# Allegro board VESC_6_MK5_BRD_11_NOV_25_TEKPA.brd
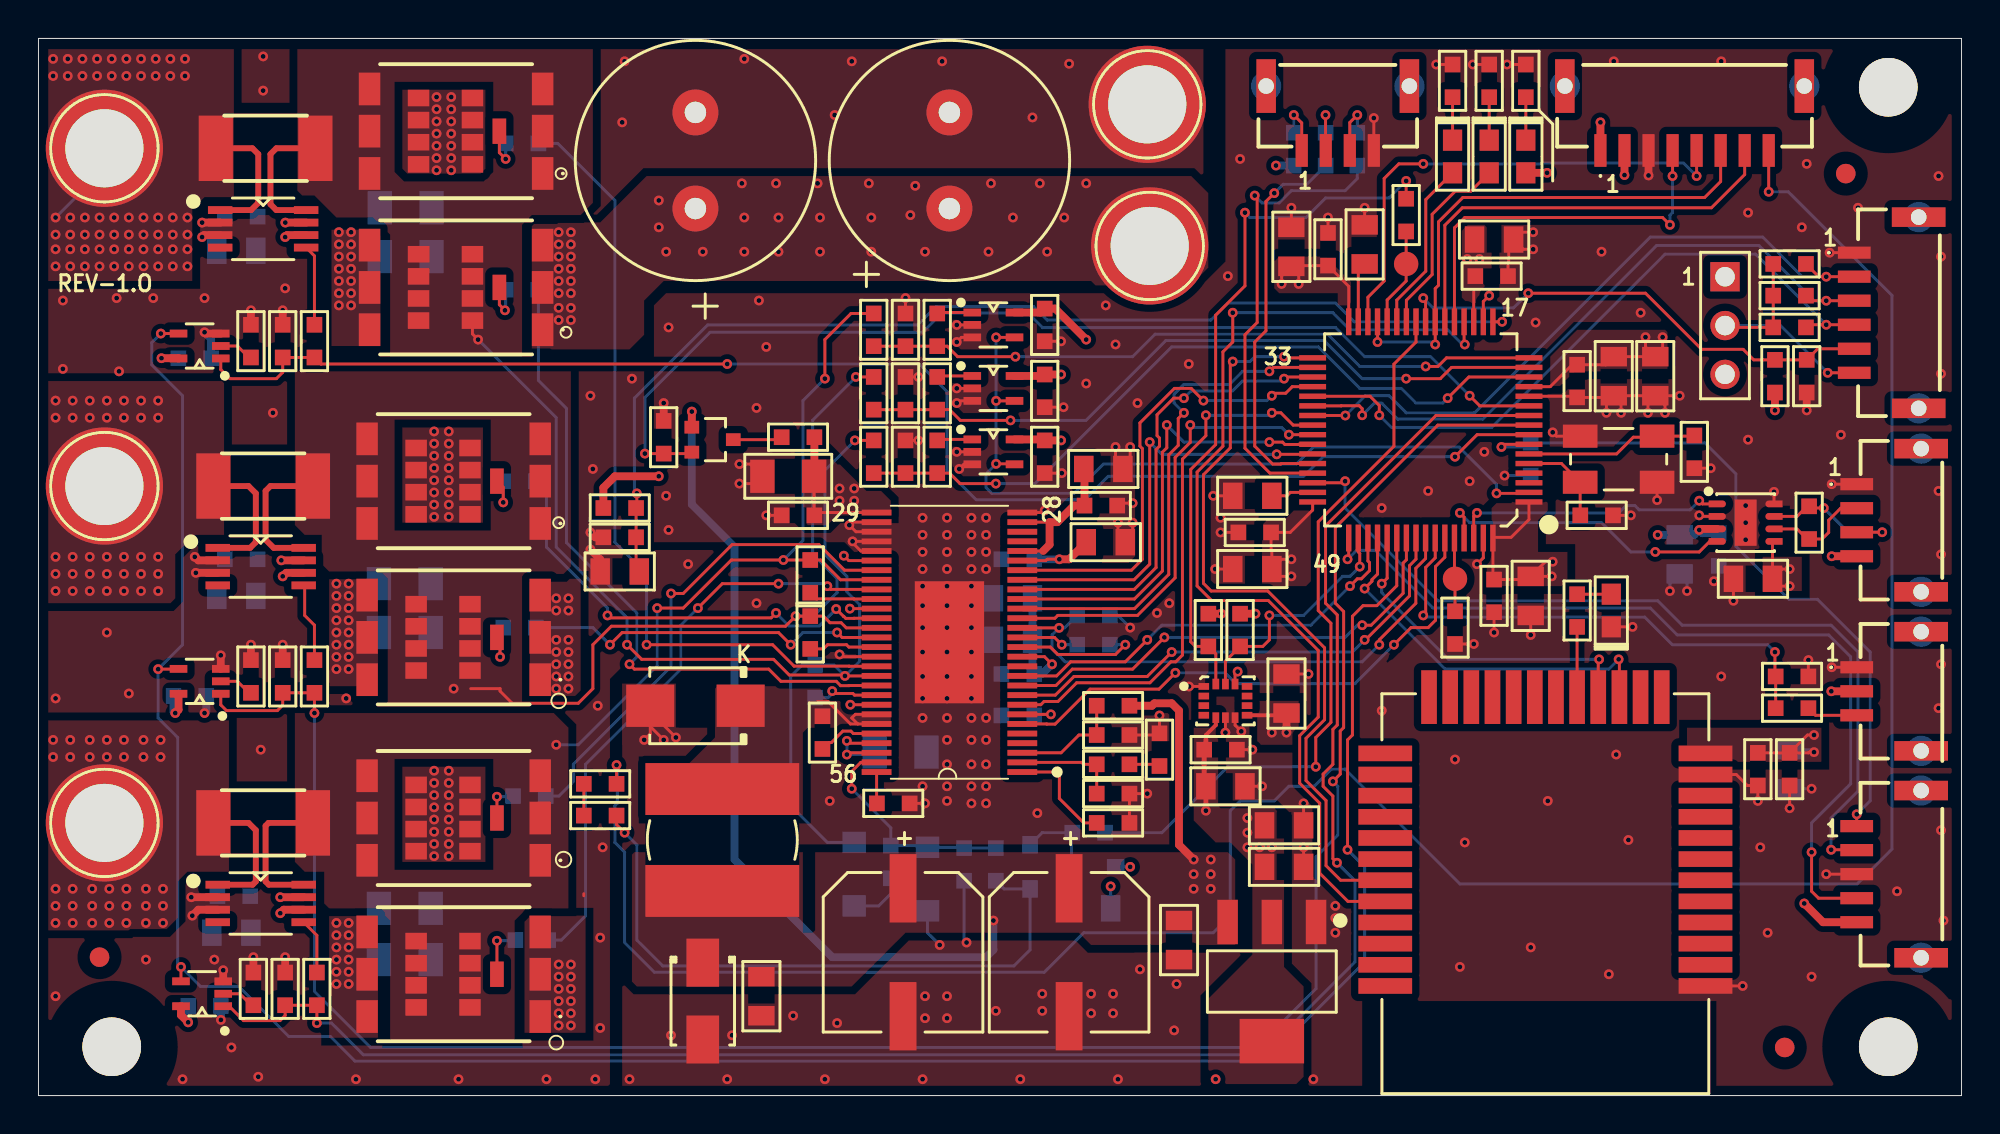
[diagram p0: board, top side]
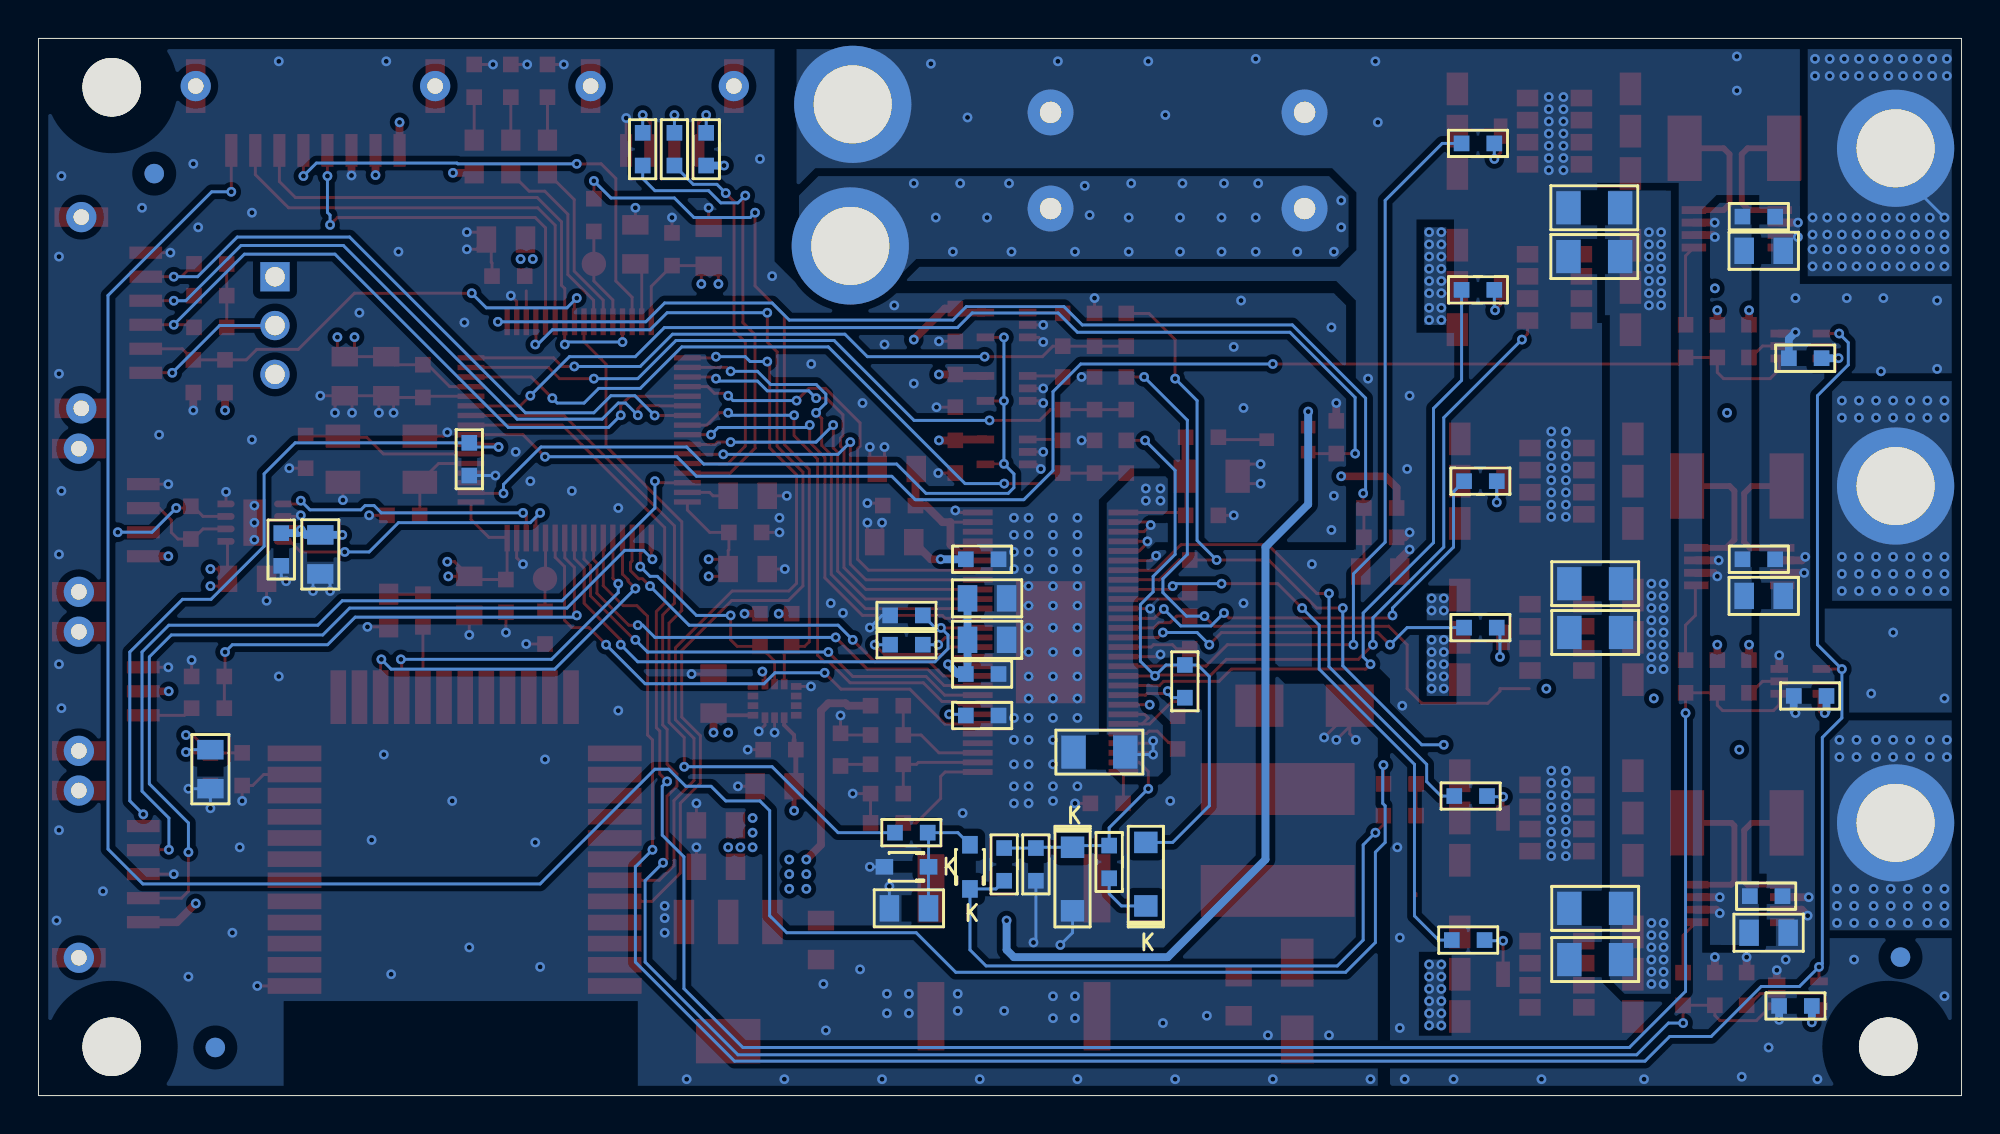
[diagram p1: board, bottom side, seen from below]

Outline 100 x 55 mm; copper layers: TOP, LYR_02_GND, LYR_03_PWR, BOTTOM. Coordinates in mm from the lower left corner of the outline.
Outline path: 0,55 0,0 100,0 100,55 0,55

## Design rules (mm)
constraint set DEFAULT: min track width 0.152

## Placement (name value [footprint] x y rotation side)
C1  2.2uF  [0805]  54.74 9.74 180 bottom
C2  100nF  [0603]  52.32 33.24 90 top
C3  100nF  [0603]  91.95 37.43 270 top
C4  100nF  [0603]  91.19 21.81 180 top
C5  2.2uF  [0805]  64.9 20.92 90 top
C6  2.2uF  [0805]  61.72 16.09 0 top
C7  2.2uF  [0805]  89.15 26.89 180 top
C8  2.2uF  [0805]  85.34 28.16 270 bottom
C9  2.2uF  [0805]  91.06 16.98 90 bottom
C10  100nF  [0603]  61.47 18 180 top
C11  100nF  [0603]  89.41 16.98 90 top
C12  1uf  [0603]  91.06 16.98 90 top
C13  4.7uF_100V  [1206]  44.83 17.87 180 bottom
C14  100nF  [0603]  40.77 18.89 270 top
C15  220nF  [0603]  40.39 21.55 90 bottom
C16  2.2uF  [0805]  37.59 5.17 270 top
C17  47uF  [CAP_8X10]  53.59 7.46 270 top
C18  47uF  [CAP_8X10]  44.96 7.46 270 top
C19  22nF  [0603]  54.86 23.46 0 bottom
C20  220nF  [0603]  40.13 24.09 90 top
C21  2.2uF  [0805]  50.67 25.87 0 bottom
C22  2.2uF  [0805]  50.67 23.71 0 bottom
C23  220nF  [0603]  40.13 27.01 90 top
C24  2.2uF  [0805]  55.5 28.79 180 top
C25  2.2uF  [0805]  55.37 32.6 180 top
C26  4.7uF_100V  [1206]  38.99 32.22 0 top
C27  100nF  [0603]  46.74 33.24 90 top
C28  100nF  [0603]  46.74 36.54 90 top
C29  100nF  [0603]  46.74 39.84 90 top
C30  2.2uF  [0805]  59.31 8.09 90 top
C31  2.2uF  [0805]  64.77 14.06 180 top
C32  2.2uF  [0805]  64.77 11.9 180 top
C33  4.7uF_100V  [1206]  19.1 46.19 0 bottom
C34  4.7uF_100V  [1206]  19.1 43.65 0 bottom
C35  100nF  [0603]  50.93 27.9 0 bottom
C36  4.7uF_100V  [1206]  19.05 24.09 0 bottom
C37  100nF  [0603]  39.5 30.19 0 top
C38  100nF  [0603]  50.93 21.93 0 bottom
C39  2.2uF  [0805]  10.29 43.95 0 bottom
C40  2.2uF  [0805]  10.29 26 0 bottom
C41  2.2uF  [0805]  10.03 8.47 0 bottom
C42  1n  [0603]  12.7 39.25 90 top
C43  1n  [0603]  12.7 21.81 90 top
C44  1n  [0603]  12.83 5.55 90 top
C45  15nF  [0603]  11.05 39.25 90 top
C46  15nF  [0603]  11.05 21.81 90 top
C47  15nF  [0603]  11.18 5.55 90 top
C48  2.2uF  [0805]  30.23 27.27 180 top
C49  680uF_63V  [ECAP_TH_12P5X35MM]  34.16 48.65 90 top
C50  680uF_63V  [ECAP_TH_12P5X35MM]  47.37 48.65 90 top
C51  15PF  [0603]  86.11 33.49 90 top
C52  100nF  [0603]  10.16 10.38 0 bottom
C53  100nF  [0603]  7.87 20.79 180 bottom
C54  100nF  [0603]  8.13 38.36 180 bottom
C55  100nF  [0603]  8.64 4.66 180 bottom
C56  2.2uF  [0805]  75.69 44.54 0 top
C57  2.2uF  [0805]  63.12 27.39 0 top
C58  2.2uF  [0805]  84.07 37.43 90 top
C59  2.2uF  [0805]  81.92 37.43 90 top
C60  2.2uF  [0805]  68.96 44.29 90 top
C61  2.2uF  [0805]  63.12 31.2 180 top
C62  100nF  [0603]  67.06 44.03 270 top
C63  100nF  [0603]  75.69 26 90 top
C64  100nF  [0603]  75.56 42.63 180 top
C65  100nF  [0603]  80.01 37.17 90 top
C66  6.8nF  [0603]  58.29 18 90 top
C67  100nF  [0603]  63.25 29.3 0 top
C68  120pF  [0603]  55.88 15.71 0 top
C69  15nF  [0603]  44.45 15.2 180 top
C70  100nF  [0603]  48.13 12.03 90 bottom
C71  100nF  [0603]  10.54 45.73 180 bottom
C72  100nF  [0603]  87.38 28.41 90 bottom
C73  100nF  [0603]  52.32 36.67 90 top
C74  4.7uF_100V  [1206]  19.05 26.63 0 bottom
C75  100nF  [0603]  55.24 30.7 180 top
C76  4.7uF_100V  [1206]  19.05 9.74 0 bottom
C77  4.7uF_100V  [1206]  19.05 7.07 0 bottom
C78  100nF  [0603]  77.6 33.11 90 bottom
C79  15PF  [0603]  81.03 30.19 180 top
C80  100nF  [0603]  10.54 27.9 0 bottom
C81  2.2uF  [0805]  65.15 44.16 270 top
C82  100nF  [0603]  52.32 40.09 90 top
C83  2.2uF  [0805]  77.6 26 90 top
D1  D_Schottky  [SOD_123]  42.42 11.52 270 bottom
D2  D_Schottky  [SOD_323]  51.56 11.9 90 bottom
D3  3.6V  [SOD_123]  46.23 11.27 90 bottom
D4  D_Schottky  [SOD_323]  54.86 11.9 0 bottom
D5  BLUE  [LED_0603]  77.34 48.86 90 top
D6  RED  [LED_0603]  73.53 48.86 90 top
D7  GREEN  [LED_0603]  75.44 48.86 90 top
D8  RED  [LED_0603]  81.79 25.24 270 top
D9  DIODE SCHOTTKY  [DO214AA]  34.16 20.28 180 top
D10  TVS_5V  [DO-214AC]  34.54 4.92 270 top
J4  CON3  [HDR_1X3]  87.7 42.6 270 top
L1  22uH  [IND_7P8X7P8_SDR0805]  35.56 13.3 90 top
NOREF  -  [unnamed]  96.19 2.54 0 top
NOREF#2  -  [unnamed]  3.81 2.54 0 top
NOREF#3  -  [unnamed#2]  3.17 7.2 0 top
NOREF#4  -  [#3]  0 55 0 top
NOREF#5  -  [unnamed#2]  93.98 47.97 0 top
NOREF#6  -  [#3]  0 0 90 top
NOREF#7  -  [unnamed#2]  90.81 2.5 0 top
NOREF#8  -  [#3]  -1429.39 -1577.61 0 top
NOREF#9  -  [unnamed]  96.19 52.46 0 top
NOREF#10  -  [unnamed#2]  93.98 47.97 180 bottom
NOREF#11  -  [unnamed#2]  90.81 2.5 180 bottom
NOREF#12  -  [unnamed#2]  3.17 7.2 180 bottom
P1  SWD_VER  [CON_4P_VRT_BM04BGHSTB]  67.56 51.4 180 top
P2  HALL_ENC  [CON_6P_VRT_BM06BGHSTBT]  96.65 40.73 90 top
P3  COMM  [CON_8P_VRT_BM08BGHSTBT]  85.6 51.4 180 top
P4  SERVO  [CON_3P_VRT_BM03BGHSTB]  96.77 20.41 90 top
P5  SWD_VER  [CON_5P_VRT_BM05BGHSTBT]  96.77 11.52 90 top
P6  CAN  [CON_4P_VRT_BM04BGHSTB]  96.77 29.93 90 top
P7  SUPPLY  [TP_TH_120MILS]  57.78 44.2 0 top
P8  PH_A  [TP_TH_120MILS]  3.43 49.28 0 top
P9  PH_B  [TP_TH_120MILS]  3.43 31.71 0 top
P10  PH_C  [TP_TH_120MILS]  3.43 14.19 0 top
P11  GND  [TP_TH_120MILS]  57.66 51.57 0 top
Q1  DMN62D0UW-7  [SOT323_3P]  35.05 34.13 270 top
Q2  IRF7749  [IRF7749L1TRPBF]  21.72 42.05 180 top
Q3  IRF7749  [IRF7749L1TRPBF]  21.59 6.31 180 top
Q4  IRF7749  [IRF7749L1TRPBF]  21.59 23.84 180 top
Q5  IRF7749  [IRF7749L1TRPBF]  21.72 50.17 180 top
Q6  IRF7749  [IRF7749L1TRPBF]  21.59 31.97 180 top
Q7  IRF7749  [IRF7749L1TRPBF]  21.59 14.44 180 top
R1  0R,DNP  [0603]  65.28 49.24 270 bottom
R2  22R  [0603]  66.93 49.24 270 bottom
R3  22R  [0603]  68.58 49.24 270 bottom
R4  2k2  [0603]  91.06 39.97 0 top
R5  39k  [0603]  44.32 12.15 90 bottom
R6  2k2  [0603]  91.06 41.62 0 top
R7  2k2  [0603]  91.06 43.27 0 top
R8  10k  [0603]  90.3 37.43 270 top
R9  56k  [0603]  49.78 12.03 90 bottom
R10  220R  [0603]  54.61 13.68 180 bottom
R11  1k_PTC  [0603]  29.21 14.57 0 top
R12  1k_PTC  [0603]  29.21 16.22 180 top
R13  100R  [0603]  91.19 20.16 0 top
R14  440R  [0603]  77.34 52.79 90 top
R15  220R  [0603]  73.53 52.79 90 top
R16  220R  [0603]  75.44 52.79 90 top
R17  1k  [0603]  60.83 24.22 90 top
R18  1k  [0603]  62.48 24.22 90 top
R19  220R  [0603]  92.08 29.81 90 top
R20  1k  [0603]  80.01 25.24 270 top
R21  3.3k  [0603]  55.88 18.76 180 top
R22  220K  [0603]  55.88 14.19 180 top
R23  15k  [0603]  55.88 17.23 180 top
R24  18k  [0603]  55.88 20.28 0 top
R25  10k  [0603]  50.93 19.77 0 bottom
R26  10k  [0603]  54.86 24.98 180 bottom
R27  39k  [0603]  39.5 34.25 180 top
R28  2k2  [0603]  32.51 34.25 90 top
R29  39k_60V  [0603]  43.43 33.24 270 top
R30  39k_60V  [0603]  43.43 36.54 270 top
R31  39k_60V  [0603]  43.43 39.84 270 top
R32  2k2  [0603]  45.09 33.24 90 top
R33  2k2  [0603]  45.09 36.54 90 top
R34  2k2  [0603]  45.09 39.84 90 top
R35  4.7R  [0603]  25.02 24.35 180 bottom
R36  4.7R  [0603]  25.15 41.92 180 bottom
R37  4.7R  [0603]  25.65 8.09 180 bottom
R38  0.0005R  [2512_MET]  11.81 49.28 0 top
R39  0.0005R  [2512_MET]  11.68 31.71 0 top
R40  0.0005R  [2512_MET]  11.68 14.19 0 top
R41  4.7R  [0603]  25.15 49.54 180 bottom
R42  4.7R  [0603]  25.02 31.97 180 bottom
R43  4.7R  [0603]  25.53 15.58 180 bottom
R44  1k  [0603]  14.35 39.25 90 top
R45  1k  [0603]  14.35 21.81 90 top
R46  1k  [0603]  14.48 5.55 90 top
R47  NTC_10K  [0603]  30.23 30.57 180 top
R48  10k  [0603]  30.23 29.05 0 top
R49  10k  [0603]  73.66 24.35 90 top
R50  0R  [0603]  71.12 45.81 270 top
TP1  T POINT R  [TP_50MIL]  71.12 43.27 180 top
TP2  T POINT R  [TP_50MIL]  73.66 26.89 180 top
U1  DRV8301  [HTSSOP_56P_6X14MM]  47.37 23.58 180 top
U2  BMI270  [LGA_14P_2P5X3MM]  61.72 20.54 0 top
U3  TJA1051TK3  [VSON_8P_3X3MM_TP]  88.77 29.81 270 top
U4  Core51822(B)  [BLE_36P_MOD_17X20P8MM_NRF_CORE51822B]  78.36 10.5 180 top
U5  TC2117  [SOT223_4P]  64.14 5.93 270 top
U6  MC74VHC1GT66  [SC70_5P]  49.66 33.49 0 top
U7  MC74VHC1GT66  [SC70_5P]  49.66 36.79 0 top
U8  MC74VHC1GT66  [SC70_5P]  49.66 40.09 0 top
U9  AD8418  [MSOP8]  11.68 45.09 0 top
U10  AD8418  [MSOP8]  11.56 27.52 0 top
U11  AD8418  [MSOP8]  11.56 10 0 top
U12  MC74VHC1GT66  [SC70_5P]  8.38 39 180 top
U13  MC74VHC1GT66  [SC70_5P]  8.38 21.55 180 top
U14  MC74VHC1GT66  [SC70_5P]  8.51 5.3 180 top
U15  STM32F405RGT6_LQFP64  [LQFP64_10X10MM]  71.88 34.63 180 top
Y1  ABM3B-8.000MHZ  [XTAL_4P_5X3P2MM_ABM3B]  82.17 33.11 0 top

## Library data of the parts
C1-C16 C19-C48 C51-C83 = CAP NP
C17 C18 C49 C50 = CAP POL_0
D1 D2 D4 = DIODE SCHOTTKY_0
D3 = DIODE31_0
D5-D8 = LED_3
D9 = DIODE SCHOTTKY_1
D10 = DIODE TVS_0
J4 = CON3_1
L1 = INDUCTOR
P1 = CON6A_8
P2 = CON6_0
P3 = CON8
P4 = CON3
P5 = CON5
P6 = CON4_0
P7-P11 = CON1
Q1 = MOSFET N_3
Q2-Q7 = MOSFET N_5
R1-R37 R41-R50 = R
R38-R40 = R_3
TP1 TP2 = T POINT R
U1 = CON58_3
U2 = CON14C_1
U3 = CON8_8
U4 = CON28C_9
U5 = CON2AP_4
U6-U8 U12-U14 = CON6A_5
U9-U11 = CON8A_5
U15 = CON60_5
Y1 = CRYSTAL1-4/SM_9

## Footprints (pads in the part's own frame, mm; a bottom-side part is the same pattern mirrored in y, then rotated)
0603
  rect 0.813x0.813 smd: 1(-0.851,0) 2(0.851,0)
0805
  rect 1.016x1.372 smd: 1(-1.016,0) 2(1.016,0)
1206
  rect 1.27x1.727 smd: 1(-1.346,0) 2(1.346,0)
2512_MET
  rect 1.778x3.404 smd: 1(-2.589,0) 2(2.589,0)
BLE_36P_MOD_17X20P8MM_NRF_CORE51822B
  rect 2.794x0.813 smd: 1(-8.327,4.8) 2(-8.327,3.7) 3(-8.327,2.6) 4(-8.327,1.5) 5(-8.327,0.4) 6(-8.327,-0.7) 7(-8.327,-1.8) 8(-8.327,-2.9) 9(-8.327,-4) 10(-8.327,-5.1) 11(-8.327,-6.2) 12(-8.327,-7.3) 25(8.327,-7.3) 26(8.327,-6.2) 27(8.327,-5.1) 28(8.327,-4) 29(8.327,-2.9) 30(8.327,-1.8) 31(8.327,-0.7) 32(8.327,0.4) 33(8.327,1.5) 34(8.327,2.6) 35(8.327,3.7) 36(8.327,4.8)
  rect 0.813x2.794 smd: 13(-6.05,-10.227) 14(-4.95,-10.227) 15(-3.85,-10.227) 16(-2.75,-10.227) 17(-1.65,-10.227) 18(-0.55,-10.227) 19(0.55,-10.227) 20(1.65,-10.227) 21(2.75,-10.227) 22(3.85,-10.227) 23(4.95,-10.227) 24(6.05,-10.227)
CAP_8X10
  rect 3.556x1.397 smd: N(3.328,0) P(-3.328,0)
CON_3P_VRT_BM03BGHSTB
  rect 1.016x2.794 hole 0.813: (-2.475,-1.125) (3.725,-1.125)
  rect 0.635x1.702 smd: 1(1.875,2.225) 2(0.625,2.225) 3(-0.625,2.225)
CON_4P_VRT_BM04BGHSTB
  rect 1.016x2.794 hole 0.813: (-3.725,-1.125) (3.725,-1.125)
  rect 0.635x1.702 smd: 1(1.875,2.225) 2(0.625,2.225) 3(-0.625,2.225) 4(-1.875,2.225)
CON_5P_VRT_BM05BGHSTBT
  rect 1.016x2.794 hole 0.813: (-4.35,-1.125) (4.35,-1.125)
  rect 0.635x1.702 smd: 1(2.5,2.225) 2(1.25,2.225) 3(0,2.225) 4(-1.25,2.225) 5(-2.5,2.225)
CON_6P_VRT_BM06BGHSTBT
  rect 1.016x2.794 hole 0.813: (-4.975,-1.125) (4.975,-1.125)
  rect 0.635x1.702 smd: 1(3.125,2.225) 2(1.875,2.225) 3(0.625,2.225) 4(-0.625,2.225) 5(-1.875,2.225) 6(-3.125,2.225)
CON_8P_VRT_BM08BGHSTBT
  rect 1.016x2.794 hole 0.813: (-6.225,-1.125) (6.225,-1.125)
  rect 0.635x1.702 smd: 1(4.375,2.225) 2(3.125,2.225) 3(1.875,2.225) 4(0.625,2.225) 5(-0.625,2.225) 6(-1.875,2.225) 7(-3.125,2.225) 8(-4.375,2.225)
DO214AA
  rect 2.5x2.2 smd: A(2.35,0) K(-2.35,0)
DO-214AC
  rect 2.5x1.7 smd: A(2,0) K(-2,0)
ECAP_TH_12P5X35MM
  round 2.388 hole 1.118: N(2.5,0) P(-2.5,0)
HDR_1X3
  rect 1.524x1.524 hole 1.016: 1(0,0)
  round 1.524 hole 1.016: 2(2.54,0) 3(5.08,0)
HTSSOP_56P_6X14MM
  rect 1.549x0.305 smd: 1(-3.788,6.75) 2(-3.788,6.25) 3(-3.788,5.75) 4(-3.788,5.25) 5(-3.788,4.75) 6(-3.788,4.25) 7(-3.788,3.75) 8(-3.788,3.25) 9(-3.788,2.75) 10(-3.788,2.25) 11(-3.788,1.75) 12(-3.788,1.25) 13(-3.788,0.75) 14(-3.788,0.25) 15(-3.788,-0.25) 16(-3.788,-0.75) 17(-3.788,-1.25) 18(-3.788,-1.75) 19(-3.788,-2.25) 20(-3.788,-2.75) 21(-3.788,-3.25) 22(-3.788,-3.75) 23(-3.788,-4.25) 24(-3.788,-4.75) 25(-3.788,-5.25) 26(-3.788,-5.75) 27(-3.788,-6.25) 28(-3.788,-6.75) 29(3.788,-6.75) 30(3.788,-6.25) 31(3.788,-5.75) 32(3.788,-5.25) 33(3.788,-4.75) 34(3.788,-4.25) 35(3.788,-3.75) 36(3.788,-3.25) 37(3.788,-2.75) 38(3.788,-2.25) 39(3.788,-1.75) 40(3.788,-1.25) 41(3.788,-0.75) 42(3.788,-0.25) 43(3.788,0.25) 44(3.788,0.75) 45(3.788,1.25) 46(3.788,1.75) 47(3.788,2.25) 48(3.788,2.75) 49(3.788,3.25) 50(3.788,3.75) 51(3.788,4.25) 52(3.788,4.75) 53(3.788,5.25) 54(3.788,5.75) 55(3.788,6.25) 56(3.788,6.75)
  rect 3.607x6.35 smd: 57(0,0)
IND_7P8X7P8_SDR0805
  rect 2.7x8 smd: 1(-2.65,0) 2(2.65,0)
IRF7749L1TRPBF
  rect 1.118x1.702 smd: 1(-4.5,2.2) 2(-4.5,0) 3(-4.5,-2.2) 4(4.5,-2.2) 5(4.5,0) 6(4.5,2.2)
  rect 0.711x1.321 smd: 7(-2.25,0)
  rect 1.118x0.864 smd: 8(-0.85,1.725) 9(-0.85,0.575) 10(-0.85,-0.575) 11(-0.85,-1.725) 12(1.95,-1.725) 13(1.95,-0.575) 14(1.95,0.575) 15(1.95,1.725)
LED_0603
  rect 1.1x1 smd: A(-0.85,0) K(0.85,0)
LGA_14P_2P5X3MM
  rect 0.55x0.35 smd: 1(-1.125,0.75) 2(-1.125,0.25) 3(-1.125,-0.25) 4(-1.125,-0.75) 8(1.125,-0.75) 9(1.125,-0.25) 10(1.125,0.25) 11(1.125,0.75)
  rect 0.35x0.55 smd: 5(-0.5,-0.875) 6(0,-0.875) 7(0.5,-0.875) 12(0.5,0.875) 13(0,0.875) 14(-0.5,0.875)
LQFP64_10X10MM
  rect 1.397x0.279 smd: 1(-5.625,3.749) 2(-5.625,3.251) 3(-5.625,2.751) 4(-5.625,2.25) 5(-5.625,1.75) 6(-5.625,1.25) 7(-5.625,0.749) 8(-5.625,0.249) 9(-5.625,-0.249) 10(-5.625,-0.749) 11(-5.625,-1.25) 12(-5.625,-1.75) 13(-5.625,-2.25) 14(-5.625,-2.751) 15(-5.625,-3.251) 16(-5.625,-3.749) 33(5.625,-3.749) 34(5.625,-3.251) 35(5.625,-2.751) 36(5.625,-2.25) 37(5.625,-1.75) 38(5.625,-1.25) 39(5.625,-0.749) 40(5.625,-0.249) 41(5.625,0.249) 42(5.625,0.749) 43(5.625,1.25) 44(5.625,1.75) 45(5.625,2.25) 46(5.625,2.751) 47(5.625,3.251) 48(5.625,3.749)
  rect 0.279x1.397 smd: 17(-3.749,-5.625) 18(-3.251,-5.625) 19(-2.751,-5.625) 20(-2.25,-5.625) 21(-1.75,-5.625) 22(-1.25,-5.625) 23(-0.749,-5.625) 24(-0.249,-5.625) 25(0.249,-5.625) 26(0.749,-5.625) 27(1.25,-5.625) 28(1.75,-5.625) 29(2.25,-5.625) 30(2.751,-5.625) 31(3.251,-5.625) 32(3.749,-5.625) 49(3.749,5.625) 50(3.251,5.625) 51(2.751,5.625) 52(2.25,5.625) 53(1.75,5.625) 54(1.25,5.625) 55(0.749,5.625) 56(0.249,5.625) 57(-0.249,5.625) 58(-0.749,5.625) 59(-1.25,5.625) 60(-1.75,5.625) 61(-2.25,5.625) 62(-2.751,5.625) 63(-3.251,5.625) 64(-3.749,5.625)
MSOP8
  rect 1.27x0.406 smd: 1(-2.235,0.975) 2(-2.235,0.325) 3(-2.235,-0.325) 4(-2.235,-0.975) 5(2.235,-0.975) 6(2.235,-0.325) 7(2.235,0.325) 8(2.235,0.975)
SC70_5P
  rect 0.914x0.406 smd: 1(-1.098,0.648) 2(-1.098,0) 3(-1.098,-0.648) 4(1.098,-0.648) 5(1.098,0.648)
SOD_123
  rect 1.118x1.219 smd: A(-1.652,0) K(1.652,0)
SOD_323
  rect 0.914x0.813 smd: A(1.15,0) K(-1.15,0)
SOT223_4P
  rect 2.311x1.067 smd: 1(-3.1,2.3) 2(-3.1,0) 3(-3.1,-2.3)
  rect 2.311x3.353 smd: 4(3.1,0)
SOT323_3P
  rect 0.66x0.762 smd: 1(-0.65,-1.078) 2(0.65,-1.078) 3(0,1.078)
TP_50MIL
  round 1.27 smd: 1(0,0)
TP_TH_120MILS
  round 6.096 hole 4.064: 1(0,0)
unnamed
  round 3.048 hole 3.175 unplated: (0,0)
unnamed#2
  round 1.016 smd: 1(0,0)
VSON_8P_3X3MM_TP
  custom 0.35x0.892 smd: 1(-0.975,-1.475) 2(-0.325,-1.475) 3(0.325,-1.475) 4(0.975,-1.475) 5(0.975,1.475) 6(0.325,1.475) 7(-0.325,1.475) 8(-0.975,1.475)
  rect 2.413x1.143 smd: 9(0,0)
XTAL_4P_5X3P2MM_ABM3B
  rect 1.8x1.2 smd: 1(-2,-1.2) 2(2,-1.2) 3(2,1.2) 4(-2,1.2)

## Nets
+5V: C8.1 C16.1 C17.P C18.P C30.2 C72.2 D10.K(CATHODE) J4.1 L1.1 P3.1 P4.2 P6.4 Q1.1 R1.2 R24.2 U3.3 U5.3(VI)
VCC: C2.2 C5.1 C6.1 C7.1 C9.2 C10.2 C11.2 C12.2 C31.2 C32.2 C39.2 C40.2 C41.2 C52.2 C53.2 C54.2 C55.2 C56.1 C57.2 C58.2 C59.2 C62.2 C63.2 C64.2 C65.2 C67.2 C71.1 C73.2 C80.2 C81.2 C82.2 C83.2 D5.A J4.3 P3.2 P5.5 R8.2 R17.2 R18.2 R47.2 U1.49 U2.5(VDDIO) U2.8 U2.12 U3.5(VIO) U4.12(VCC) U5.2 U5.4 U6.5(VCC) U7.5(VCC) U8.5(VCC) U9.6(VS) U9.7 U10.6(VS) U10.7 U11.6(VS) U11.7 U12.5(VCC) U13.5(VCC) U14.5(VCC) U15.1 U15.13 U15.19 U15.32 U15.48 U15.64
0: C1.1 C2.1 C3.2 C4.1 C5.2 C6.2 C7.2 C8.2 C9.1 C10.1 C11.1 C12.1 C13.1 C16.2 C17.N C18.N C21.1 C22.1 C24.1 C25.1 C26.1 C30.1 C31.1 C32.1 C35.1 C37.1 C38.1 C51.1 C56.2 C57.1 C58.1 C59.1 C60.2 C61.2 C62.1 C63.1 C64.1 C65.1 C66.2 C67.1 C68.2 C69.1 C70.1 C72.1 C73.1 C75.1 C78.1 C79.1 C81.1 C82.1 C83.1 D3.A D4.A D8.K(CATHODE) D9.A D10.A P1.4 P2.1 P3.3 P4.1 P5.3 P6.1 R14.2 R15.2 R16.2 R21.1 R22.1 R25.1 R26.1 R28.2 R32.2 R33.2 R34.2 R49.1 U1.28 U1.30 U1.31 U1.32 U1.33 U1.57 U2.1 U2.6 U2.7 U3.2 U3.8 U3.9 U4.1 U4.11 U5.1 U6.2 U6.3 U7.2 U7.3 U8.2 U8.3 U15.12 U15.18 U15.63(VSS_2) Y1.2 Y1.4
BT_HV: C13.2 C26.2 C33.1 C34.1 C36.1 C37.2 C49.P C50.P C74.1 C76.1 C77.1 P7.1 Q2.1 Q2.2 Q2.3 Q2.4 Q2.5 Q2.6 Q3.1 Q3.2 Q3.3 Q3.4 Q3.5 Q3.6 Q4.1 Q4.2 Q4.3 Q4.4 Q4.5 Q4.6 R27.1 U1.29 U1.53 U1.54
C_A: R44.2 U9.5
C_B: R45.2 U10.5
C_C: R46.2 U11.5
CONN_SW: P3.8 R12.1
EN_BUCK: C70.2 D3.K R5.2 R9.2 U1.55
PH_A: P8.1 R38.1 U9.1
PH_B: P9.1 R39.1 U10.1
PH_C: P10.1 R40.1 U11.1
SH_A: C15.2 D1.A Q2.8 Q2.9 Q2.10 Q2.11 Q2.12 Q2.13 Q2.14 Q2.15(S8) Q5.1 Q5.2 Q5.3 Q5.4 Q5.5 Q5.6 R29.1 R38.2 U1.46 U9.8
SHUTDOWN: R10.1 U15.25
N113958: J4.2 P2.6 R4.1 R6.1 R7.1
N114102: P2.2 R7.2 U15.39
N114106: P2.3 R6.2 U15.38
N114110: P2.4 R4.2 U15.37
N114114: C3.1 P2.5 R8.1 U15.24
N119424: P4.3 R13.2
N119428: C4.2 R13.1 U15.58
N316048: P5.4 U15.49
N316068: P5.2 U15.46
N316080: C78.2 P5.1 U15.7
N316972: D5.K(CATHODE) R14.1
N317032: D6.A U15.27
N317036: D6.K(CATHODE) R15.1
N317096: D7.A U15.26
N317100: D7.K(CATHODE) R16.1
N320425: D2.K(CATHODE) R9.1 R11.2
N320494: R11.1 R12.2
N320696: C1.2 D2.A D4.K(CATHODE) R10.2
N321457: D1.K(CATHODE) R5.1
N379550: C60.1 U15.31
N379578: C61.1 U15.47
N382210: C69.2 U1.56
N382270: C66.1 R23.1
N382306: R21.2 R24.1 U1.3(VSENSE)
N382374: C68.1 R23.2 U1.2
N382386: R22.2 U1.1
N382652: C14.2 U1.52
N382656: C14.1 D9.K(CATHODE) L1.2 U1.50 U1.51
N382740: R25.2 U1.7
N382848: C15.1 U1.48
N382956: C21.2 C22.2 C38.2 U1.13
N383040: C19.2 U1.14
N383044: C20.1 U1.43
N383064: C19.1 U1.15
N383228: C23.1 U1.38
N383264: Q1.3 R27.2
N383316: C24.2 C35.2 U1.23
N383358: C25.2 C75.2 U1.24 U1.27
N399081: Q5.7 R41.2
N399151: Q2.7 R36.2
N405714: Q4.7 R35.2
N405958: Q6.7 R42.2
N406713: Q3.7 R37.2
N406957: Q7.7 R43.2
N413411: C45.1 U12.2
N415177: C46.1 U13.2
N415727: C47.1 U14.2
N421403: P1.1(VBUS) R1.1
N421435: P1.2 R2.1
N421455: R2.2 U15.44
N421467: P1.3 R3.1
N421471: R3.2 U15.45
N440238: C79.2 U15.5 Y1.1
N440256: C51.2 U15.6 Y1.3
N453854: C27.2 U6.1
N453874: C28.2 U7.1
N453894: C29.2 U8.1
N475951: R49.2 TP2.1(TP) U15.60
N476249: R50.2 TP1.1(TP) U15.28
N483635: R36.1 U1.47
N483651: R41.1 U1.45
N483659: C33.2 C34.2 C36.2 C39.1 C40.1 C41.1 C42.2 C43.2 C44.2 C45.2 C46.2 C47.2 C48.2 C49.N C50.N C52.1 C53.1 C54.1 C55.1 C71.2 C74.2 C76.2 C77.2 C80.1 P11.1 Q5.8 Q5.9 Q5.10 Q5.11 Q5.12 Q5.13 Q5.14 Q5.15(S8) Q6.8 Q6.9 Q6.10 Q6.11 Q6.12 Q6.13 Q6.14 Q6.15(S8) Q7.8 Q7.9 Q7.10 Q7.11 Q7.12 Q7.13 Q7.14 Q7.15(S8) R48.1 U1.34 U1.39 U1.44 U9.2 U9.3 U10.2 U10.3 U11.2 U11.3 U12.3 U13.3 U14.3
N488558: P6.3 R19.2 U3.7
N488562: P6.2 R19.1 U3.6
N488738: R18.1 U2.13 U15.50
N488742: R17.1 R50.1 U2.14
N490262: U3.1 U15.62
N490274: U3.4 U15.61
N490496: U4.32 U15.20
N490506: U4.31 U15.33
N490510: U4.15 U15.52
N490514: U4.16 U15.53
N490522: R20.2 U4.17
N492162: P3.7 U15.22
N492166: P3.6 U15.23 U15.29
N492170: P3.5 U15.30
N492258: P3.4 U15.21
N494356: U1.17 U15.41
N494360: U1.19 U15.42
N494364: U1.21 U15.43
N494368: U1.18 U15.34
N494372: U1.20 U15.35
N494376: U1.22 U15.36
N494756: U1.6 U15.59
N494760: R26.2 U1.16 U15.57
N495156: U1.10 U15.55
N495160: U1.9 U15.56
N495164: U1.11 U15.51
N495168: U1.8 U15.40
N495709: C27.1 R29.2 R32.1 U15.14
N495713: C28.1 R30.2 R33.1 U15.15
N495717: C29.1 R31.2 R34.1 U15.16
N495721: Q1.2(S) R28.1 U15.11
N495725: U6.4 U7.4 U8.4 U15.2
N495729: U12.4 U13.4 U14.4 U15.54
N495741: C42.1 R44.1 U12.1 U15.8
N495753: C43.1 R45.1 U13.1 U15.9
N495765: C44.1 R46.1 U14.1 U15.10
N495777: C48.1 R47.1 R48.2 U15.17
N496269: R35.1 U1.42
N496273: C20.2 Q4.8 Q4.9 Q4.10 Q4.11 Q4.12 Q4.13 Q4.14 Q4.15(S8) Q6.1 Q6.2 Q6.3 Q6.4 Q6.5 Q6.6 R30.1 R39.2 U1.41 U10.8
N496277: R42.1 U1.40
N496285: R37.1 U1.37
N496289: C23.2 Q3.8 Q3.9 Q3.10 Q3.11 Q3.12 Q3.13 Q3.14 Q3.15(S8) Q7.1 Q7.2 Q7.3 Q7.4 Q7.5 Q7.6 R31.1 R40.2 U1.36 U11.8
N496293: R43.1 U1.35
N4906060: D8.A R20.1

Pads without a net: NOREF#3 1; NOREF#5 1; NOREF#7 1; NOREF#10 1; NOREF#11 1; NOREF#12 1; U1 4 5 12 25 26; U2 2 3 4 9 10 11; U4 2 3 4 5 6 7 8 9 10 13 14 18 19 20 21 22 23 24 25 26 27 28 29 30 33 34 35 36; U9 4; U10 4; U11 4; U15 3 4

## Via types
v1: diameter 0.508, hole 0.254, TOP to BOTTOM, 774 vias

## Routing (per net, layer and track width the routed paths; a pad name or vN(x,y) marks a point on that pad's centre or on a via; arc(x,y) is an arc through that point)
+5V: length 62.5
  TOP w0.406: v1(60.07,12.28) 59.31,13.04 59.31,20.03 58.93,20.41 58.03,20.41 57.9,20.28 R24.2 ; U3.3 86.42,29.48 v1(86.36,29.43) ; Q1.1 v1(33.97,35.59) ; P3.1 v1(81.22,50.64) ; P4.2 v1(93.23,21.03) ; P6.4 v1(93.25,28.06)
  BOTTOM w0.406: R1.2 v1(64.35,48.39) ; v1(49.66,9.11) 49.66,7.58 49.28,7.2 41.27,7.2 36.2,12.28 36.2,28.54 33.97,30.76 v1(33.97,35.59) ; C72.2 86.53,29.26 v1(86.36,29.43) 86.11,29.17 C8.1 v1(84.2,29.17)
  vias: v1(60.07,11.52) v1(60.07,10.76) v1(60.96,12.28) v1(60.96,11.52) v1(60.96,10.76)
VCC: length 90.5
  TOP w0.152: U15.48 66.26,30.46 65.09,29.3 C67.2 64.1,28.4 64.14,28.36 C57.2 ; v1(65.53,42.23) 65.53,42.76 65.15,43.14 ; 65.15,43.14 64.64,42.63 v1(64.64,42.23) ; 65.15,43.14 65.19,43.18 C62.2 68.13,42.1 U15.32 ; U15.1 77.51,29.97 76.58,29.05 75.67,29.05 U15.64 75.63,26.91 C63.2 77.43,26.85 C83.2 ; v1(91.06,27.39) 90.68,27.39 C7.1 ; U1.49 v1(42.22,20.33) ; v1(83.57,39.46) 83.57,38.95 C58.2 ; U15.19 74.63,41.87 ; C57.2 64.52,27.01 v1(65.15,27.01) ; C57.2 64.64,27.9 v1(65.15,27.9) ; C83.2 v1(78.69,27.01) ; C83.2 78.36,27.78 v1(78.74,27.78) ; C7.1 90.55,26.51 v1(91.06,26.51) ; C7.1 90.17,28.75 U3.5 ; v1(92.33,18.76) 91.99,18.76 C12.2 ; C12.2 92.04,17.83 92.08,17.87 v1(92.33,17.87) ; C12.2 C11.2 ; v1(84.45,39.46) 84.45,38.82 C58.2 ; C58.2 C59.2 81.5,38.02 C65.2 79.75,38.02 78.61,36.88 U15.13 ; v1(62.36,22.06) 62.22,21.93 U2.12
  TOP w0.203: U2.8 64.78,19.79 C5.1 ; 60.71,18.5 60.71,18.76 61.22,19.27 U2.5
  TOP w0.254: 60.71,18.5 60.71,18.08 C10.2 60.62,16.18 C6.1 v1(60.71,14.82)
  TOP w0.406: v1(12.57,9.49) 12.76,9.67 U11.6 ; R17.2 v1(61.51,25.07) ; U14.5 7.41,4.18 v1(7.79,3.81) ; v1(7.11,19.9) 7.28,20.07 U13.5 ; v1(6.4,38.36) 7.27,38.36 U12.5 ; C5.1 v1(64.9,18.89) ; U9.6 12.93,44.77 v1(12.83,44.67) ; P3.2 v1(82.47,47.89) ; v1(32.26,32.22) 29.97,32.22 29.38,31.62 R47.2 ; U7.5 52.25,37.44 C73.2 v1(53.17,37.52) ; v1(53.17,34.09) C2.2 52.27,34.14 U6.5 ; v1(12.7,27.01) 12.88,27.2 U10.6 ; U11.7 v1(12.57,10.32) ; U10.7 v1(12.63,27.85) ; D5.A v1(78.45,48.01) ; R18.2 v1(63.28,25.07) ; U9.7 v1(12.84,45.42) ; R8.2 v1(90.3,35.65) ; v1(54.48,39.33) 52.87,40.94 C82.2 52.12,40.74 U8.5 ; P5.5 92.8,9.02 v1(91.82,10)
  BOTTOM w0.152: v1(92.33,17.87) 92.2,18 C9.2
  BOTTOM w0.406: C53.2 7.02,19.99 v1(7.11,19.9) ; C54.2 v1(6.4,38.36) ; C55.2 v1(7.79,3.81)
  vias: v1(62.86,14.44) v1(62.86,13.68) v1(62.86,12.92) v1(63.5,12.92) v1(64.14,18.89) v1(64.14,12.92) v1(74.3,43.52) v1(74.93,43.52)
0: length 116.2
  TOP w0.152: v1(88.62,5.7) U4.1 86.56,5.7 ; D8.K v1(82.89,24.38) ; C6.2 v1(63.63,16.09) ; v1(36.45,32.86) 37.01,32.86 C26.1 37.26,31.84 v1(36.45,31.84) ; P4.1 v1(93.25,22.28) ; v1(47.75,36.03) 47.87,36.14 U7.3 ; C10.1 v1(63.12,18) ; C12.1 v1(91.06,14.95) ; v1(82.3,35.52) 82.3,36.03 C59.1 ; U3.2 86.42,30.13 v1(86.36,30.19) ; v1(52.32,30.44) 52.22,30.33 U1.28 ; v1(89.41,15.33) C11.1 88.86,16.13 88.29,16.7 U4.11 ; U15.63 75.13,27.98 v1(74.8,27.65) ; U1.33 42.76,28.33 42.33,28.76 v1(42.33,28.83) U1.32 ; C67.1 v1(61.47,29.3) ; C69.1 v1(46.1,15.2) ; C5.2 v1(66.04,21.93) ; U7.2 v1(47.75,36.79) ; R33.2 v1(45.76,37.39) ; R22.1 C68.2 v1(57.66,15.71) ; C64.1 76.42,43.32 76.45,43.36 76.45,44.29 C56.2 ; R21.1 58.2,18.76 C66.2 v1(58.29,19.77) ; C59.1 C58.1 ; C59.1 81.83,36.32 ; v1(56.9,30.82) 56.22,30.82 C75.1 ; C82.1 v1(53.17,39.24) ; U15.18 75.13,41.31 v1(75.44,41.62) ; C60.2 v1(68.96,46.19) ; v1(77.72,44.92) 77.09,44.92 C56.2 ; C83.1 v1(77.6,23.97) ; v1(78.74,34.51) 78.94,34.31 Y1.4 ; C7.2 v1(88.14,25.74) ; U1.31 42.51,29.33 v1(42.16,29.68) 42.32,29.83 U1.30 ; R16.2 v1(74.59,53.64) ; C31.1 v1(65.79,15.2) ; U2.1 v1(59.83,21.29) ; v1(77.72,44.03) 77.22,44.03 C56.2 ; C58.1 83.69,36.03 v1(83.69,35.52) ; C58.1 84.58,35.9 v1(84.58,35.52) ; C58.1 v1(85.34,36.41) ; P2.1 v1(93.14,43.85) ; C32.1 v1(65.79,12.92) ; v1(56.77,33.74) 56.77,32.98 C25.1 56.01,32.98 v1(56.01,33.74) ; v1(31.5,18.5) 31.81,18.82 31.81,19.2 ; v1(81.53,35.52) 81.53,36.03 81.83,36.32 ; v1(56.9,29.81) 56.9,29.17 56.52,28.79 56.13,29.17 v1(56.13,29.81) ; U2.7 62.22,19.27 v1(62.55,18.95) ; 31.81,19.2 31.81,19.97 ; 31.81,19.2 v1(32.51,18.5) ; C81.1 v1(65.15,46.19) ; v1(47.88,32.6) 48.12,32.84 U6.3 ; C73.1 v1(53.3,35.81) ; P5.3 v1(92.96,11.52) ; C79.1 v1(82.8,30.19) ; U6.2 v1(47.75,33.49) ; C62.1 v1(67.06,45.68) ; R32.2 v1(45.76,34.09) ; v1(33.15,18.63) 31.81,19.97 ; 31.81,19.97 D9.A ; R49.1 v1(74.64,23.5) ; P6.1 v1(93.25,31.81) ; R34.2 v1(45.09,41.49) ; C2.1 v1(53.21,32.39) ; U8.2 v1(47.75,40.09) ; U8.3 47.99,39.45 v1(47.75,39.21) ; C57.1 v1(61.19,27.39) ; U2.6 v1(61.72,18.89) ; C61.2 v1(61.09,31.2) ; U15.12 79.95,36.38 C65.1 81.83,36.32 ; C4.1 v1(92.04,22.66) ; R14.2 v1(76.37,53.64) ; U3.8 v1(90.25,31.41) ; R15.2 v1(72.68,53.64) ; C37.1 v1(37.85,30.19) ; P1.4 v1(69.44,50.86) ; C63.1 v1(75.69,24.09) ; C51.1 v1(86.96,32.64) ; Y1.2 v1(84.17,30.98)
  TOP w0.406: C3.2 v1(91.95,35.65) ; P3.3 v1(83.72,47.87) ; R28.2 v1(32.51,36.03)
  BOTTOM w0.152: v1(85.73,26.25) 85.73,26.76 C8.2 84.84,26.63 v1(84.84,26.25) ; C70.1 48.13,8.09 v1(48.26,7.96) ; v1(92.2,15.96) C9.1 v1(91.06,14.95) ; v1(46.86,7.84) 46.23,8.47 D3.A ; D4.A v1(56.77,11.9) ; R26.1 56.13,24.98 v1(56.77,24.35) ; C78.1 v1(76.24,32.26) ; C72.1 87.38,27.01 v1(87.12,26.76) ; C1.1 v1(55.75,10.88)
  vias: v1(30.73,0.85) v1(32.64,31.2) v1(32.77,39.97) v1(32.77,29.43) v1(32.89,3.14) v1(35.81,0.85) v1(36.07,3.14) v1(37.34,35.78) v1(37.46,41.36) v1(37.85,38.95) v1(39.24,4.15) v1(40.89,0.85) v1(41.15,15.33) v1(41.53,3.77) v1(45.97,30.06) v1(45.97,29.17) v1(45.97,28.28) v1(45.97,27.39) v1(45.97,26.51) v1(45.97,25.49) v1(45.97,24.35) v1(45.97,23.08) v1(45.97,21.81) v1(45.97,20.66) v1(45.97,19.65) v1(45.97,16.09) v1(45.97,0.85) v1(46.1,5.17) v1(46.1,4.03) v1(47.24,30.06) v1(47.24,29.17) v1(47.24,28.28) v1(47.24,27.39) v1(47.24,26.51) v1(47.24,25.49) v1(47.24,24.35) v1(47.24,23.08) v1(47.24,21.81) v1(47.24,20.66) v1(47.24,19.65) v1(47.24,18.5) v1(47.24,17.23) v1(47.24,16.09) v1(47.24,15.33) v1(47.24,5.17) v1(47.24,4.03) v1(48.51,30.06) v1(48.51,29.17) v1(48.51,28.28) v1(48.51,27.39) v1(48.51,26.51) v1(48.51,25.49) v1(48.51,24.35) v1(48.51,23.08) v1(48.51,21.81) v1(48.51,20.66) v1(48.51,19.65) v1(48.51,18.5) v1(48.51,17.23) v1(48.51,16.09) v1(48.51,15.2) v1(49.28,30.06) v1(49.28,29.17) v1(49.28,28.28) v1(49.28,27.39) v1(49.28,19.65) v1(49.28,18.5) v1(49.28,17.23) v1(49.28,16.09) v1(49.28,15.2) v1(49.78,4.41) v1(51.05,0.85) v1(51.94,14.69) v1(52.2,5.3) v1(52.2,4.41) v1(54.48,37.05) v1(54.74,5.3) v1(54.74,4.28) v1(55.5,41.11) v1(55.88,5.3) v1(55.88,4.28) v1(56.01,39.08) v1(56.13,0.85) v1(57.15,36.03) v1(57.28,6.57) v1(58.17,25.11) v1(58.8,25.62) v1(59.05,3.39) v1(59.18,5.8) v1(59.82,38.06) v1(61.21,0.85) v1(61.47,30.06) v1(61.85,42.63) v1(62.48,48.73) v1(66.29,0.85) v1(67.44,9.87) v1(67.44,9.23) v1(67.44,8.47) v1(69.85,30.57) v1(69.85,20.03) v1(72.26,31.46) v1(73.66,17.49) v1(73.91,6.69) v1(74.17,13.17) v1(74.42,31.97) v1(75.18,33.49) v1(77.6,7.71) v1(77.85,40.22) v1(78.49,15.33) v1(81.28,43.9) v1(81.66,6.31) v1(81.92,53.81) v1(82.04,17.74) v1(82.68,13.3) v1(83.31,40.73) v1(87.5,53.81) v1(87.5,21.81) v1(88.77,30.7) v1(88.77,29.81) v1(88.77,28.92) v1(88.9,45.94) v1(88.9,34.13) v1(89.54,12.92) v1(89.92,8.47) v1(91.69,45.17) v1(91.95,48.48) v1(92.2,6.19) v1(93.73,34.38) v1(94.62,46.19) v1(96.65,10.63) v1(98.81,47.84) v1(98.81,31.46) v1(98.81,20.16) v1(98.93,43.65) v1(98.93,37.55) v1(98.93,28.16) v1(98.93,22.44) v1(98.93,13.81) v1(99.06,9.11)
BT_HV: length 13.1
  TOP w0.152: v1(42.04,17.74) 42.13,17.83 U1.54 ; C37.2 40.34,30.2 C26.2 40.35,32.23 ; C37.2 40.49,30.33 U1.29 ; C37.2 40.13,29.97 ; U1.53 42.16,18.33 v1(42.04,18.45)
  TOP w0.406: R27.1 40.35,32.23
  BOTTOM w0.152: C13.2 43.36,17.74 v1(42.04,17.74) v1(42.04,18.45)
  vias: v1(15.49,26.63) v1(15.49,26) v1(15.49,25.36) v1(15.49,24.73) v1(15.49,24.09) v1(15.49,23.46) v1(15.49,22.82) v1(15.49,22.19) v1(15.49,8.98) v1(15.49,8.34) v1(15.49,7.71) v1(15.49,7.07) v1(15.49,6.44) v1(15.49,5.8) v1(15.62,44.92) v1(15.62,44.29) v1(15.62,43.65) v1(15.62,43.02) v1(15.62,42.38) v1(15.62,41.75) v1(15.62,41.11) v1(16.13,26.63) v1(16.13,26) v1(16.13,25.36) v1(16.13,24.73) v1(16.13,24.09) v1(16.13,23.46) v1(16.13,22.82) v1(16.13,22.19) v1(16.13,8.98) v1(16.13,8.34) v1(16.13,7.71) v1(16.13,7.07) v1(16.13,6.44) v1(16.13,5.8) v1(16.26,44.92) v1(16.26,44.29) v1(16.26,43.65) v1(16.26,43.02) v1(16.26,42.38) v1(16.26,41.75) v1(16.26,41.11) v1(26.92,25.87) v1(26.92,25.24) v1(26.92,23.71) v1(26.92,23.08) v1(26.92,22.44) v1(26.92,21.81) v1(26.92,21.17) v1(27.05,44.92) v1(27.05,44.29) v1(27.05,43.65) v1(27.05,43.02) v1(27.05,42.38) v1(27.05,41.75) v1(27.05,40.98) v1(27.05,40.35) v1(27.05,6.82) v1(27.05,6.19) v1(27.05,5.55) v1(27.05,4.92) v1(27.05,4.28) v1(27.05,3.65) v1(27.56,25.87) v1(27.56,25.24) v1(27.56,23.71) v1(27.56,23.08) v1(27.56,22.44) v1(27.56,21.81) v1(27.56,21.17) v1(27.69,44.92) v1(27.69,44.29) v1(27.69,43.65) v1(27.69,43.02) v1(27.69,42.38) v1(27.69,41.75) v1(27.69,40.98) v1(27.69,40.35) v1(27.69,6.82) v1(27.69,6.19) v1(27.69,5.55) v1(27.69,4.92) v1(27.69,4.28) v1(27.69,3.65) v1(32.26,46.57) v1(32.26,45.17) v1(32.64,43.9) v1(34.54,43.9) v1(36.58,47.46) v1(36.7,45.68) v1(36.7,43.9) v1(38.35,47.46) v1(38.48,45.68) v1(38.48,43.9) v1(40.51,47.46) v1(40.64,45.68) v1(40.64,43.9) v1(41.66,31.59) v1(41.66,30.95) v1(42.42,31.59) v1(42.42,30.95) v1(43.18,47.46) v1(43.31,45.68) v1(43.31,43.9) v1(45.34,45.81) v1(45.59,47.33) v1(46.1,43.9) v1(49.4,43.9) v1(49.53,47.46) v1(50.67,45.68) v1(52.07,47.46) v1(52.45,43.9) v1(53.34,45.68) v1(54.48,47.46)
C_A: length 4.2
  TOP w0.152: U9.5 14.35,43.69 R44.2
C_B: length 4.1
  TOP w0.152: U10.5 13.84,26.49 13.84,24.98 14.35,24.47 R45.2
C_C: length 2.9
  TOP w0.152: R46.2 14.48,8.33 U11.5
CONN_SW: length 127.4
  TOP w0.152: P3.8 v1(89.97,47.02) ; R12.1 v1(30.06,17.2)
  BOTTOM w0.152: v1(89.97,47.02) 90.99,47.02 96.38,41.63 96.38,12.82 94.57,11.01 73.91,11.01 67.95,16.98 67.23,16.98 66.34,16.09 65.02,16.09 64.26,15.33 62.48,15.33 61.98,14.82 61.98,9.36 61.09,8.47 54.36,8.47 52.3,6.41 32.03,6.41 30.48,7.96 30.48,12.66 29.97,13.17 29.97,15.08 30.1,15.2 30.1,17.16 v1(30.06,17.2)
EN_BUCK: length 11.7
  TOP w0.152: U1.55 42.76,17.33 42.29,16.86 v1(42.29,15.96)
  BOTTOM w0.152: R9.2 C70.2 48.09,12.92 D3.K 46.14,13 R5.2 44.32,13.93 v1(42.29,15.96)
PH_A: length 11.7
  TOP w0.305: R38.1 11.13,49.28 11.43,48.98 11.43,46.44 11.06,46.07 U9.1
  BOTTOM w0.152: v1(0.89,45.68) 3.43,48.22 P8.1
  vias: v1(0.76,53.94) v1(0.76,53.05) v1(0.89,44.79) v1(0.89,44.03) v1(0.89,43.14) v1(1.52,53.94) v1(1.52,53.05) v1(1.65,45.68) v1(1.65,44.79) v1(1.65,44.03) v1(1.65,43.14) v1(2.29,53.94) v1(2.29,53.05) v1(2.41,45.68) v1(2.41,44.79) v1(2.41,44.03) v1(2.41,43.14) v1(3.05,53.94) v1(3.05,53.05) v1(3.17,45.68) v1(3.17,44.79) v1(3.17,44.03) v1(3.17,43.14) v1(3.81,53.94) v1(3.81,53.05) v1(3.94,45.68) v1(3.94,44.79) v1(3.94,44.03) v1(3.94,43.14) v1(4.57,53.94) v1(4.57,53.05) v1(4.7,45.68) v1(4.7,44.79) v1(4.7,44.03) v1(4.7,43.14) v1(5.33,53.94) v1(5.33,53.05) v1(5.46,45.68) v1(5.46,44.79) v1(5.46,44.03) v1(5.46,43.14) v1(6.1,53.94) v1(6.1,53.05) v1(6.22,45.68) v1(6.22,44.79) v1(6.22,44.03) v1(6.22,43.14) v1(6.86,53.94) v1(6.86,53.05) v1(6.99,45.68) v1(6.99,44.79) v1(6.99,44.03) v1(6.99,43.14) v1(7.62,53.94) v1(7.62,53.05) v1(7.75,45.68) v1(7.75,44.79) v1(7.75,44.03) v1(7.75,43.14)
PH_B: length 7
  TOP w0.305: R39.1 10.92,31.71 11.3,31.33 11.3,28.79 11.01,28.5 U10.1
  vias: v1(0.89,36.16) v1(0.89,35.27) v1(0.89,28.03) v1(0.89,27.14) v1(0.89,26.25) v1(1.78,36.16) v1(1.78,35.27) v1(1.78,28.03) v1(1.78,27.14) v1(1.78,26.25) v1(2.67,36.16) v1(2.67,35.27) v1(2.67,28.03) v1(2.67,27.14) v1(2.67,26.25) v1(3.56,36.16) v1(3.56,35.27) v1(3.56,28.03) v1(3.56,27.14) v1(3.56,26.25) v1(4.45,36.16) v1(4.45,35.27) v1(4.45,28.03) v1(4.45,27.14) v1(4.45,26.25) v1(5.33,36.16) v1(5.33,35.27) v1(5.33,28.03) v1(5.33,27.14) v1(5.33,26.25) v1(6.22,36.16) v1(6.22,35.27) v1(6.22,28.03) v1(6.22,27.14) v1(6.22,26.25)
PH_C: length 8.4
  TOP w0.152: 8.51,14.19 8.51,12.87
  TOP w0.305: U11.1 11.14,10.97 11.3,11.14 11.3,13.81 10.92,14.19 R40.1
  vias: v1(0.76,18.5) v1(0.76,17.62) v1(0.89,10.76) v1(0.89,9.87) v1(0.89,8.98) v1(1.65,18.5) v1(1.65,17.62) v1(1.78,10.76) v1(1.78,9.87) v1(1.78,8.98) v1(2.67,18.5) v1(2.67,17.62) v1(2.79,10.76) v1(2.79,9.87) v1(2.79,8.98) v1(3.56,18.5) v1(3.56,17.62) v1(3.68,10.76) v1(3.68,9.87) v1(3.68,8.98) v1(4.45,18.5) v1(4.45,17.62) v1(4.57,10.76) v1(4.57,9.87) v1(4.57,8.98) v1(5.46,18.5) v1(5.46,17.62) v1(5.59,10.76) v1(5.59,9.87) v1(5.59,8.98) v1(6.35,18.5) v1(6.35,17.62) v1(6.48,10.76) v1(6.48,9.87) v1(6.48,8.98)
SH_A: length 70
  TOP w0.152: U1.46 v1(41.94,21.83) 41.89,21.88 39.04,21.88 38.23,22.7 31.37,22.7 v1(30.61,23.46) ; v1(22.86,39.33) 22.57,39.62 Q2.8 ; R29.1 v1(42.46,34.09)
  TOP w0.305: R38.2 12.37,49.28 12.07,48.98 12.07,46.37 12.37,46.07 U9.8
  BOTTOM w0.152: v1(22.86,39.33) 26.92,35.27 26.92,28.54 30.61,24.85 v1(30.61,23.46) ; v1(42.46,34.09) 40.89,32.53 40.89,28.16 42.04,27.01 42.04,26.21 42.7,25.54 42.7,22.6 v1(41.94,21.83) 41.37,22.4 C15.2 39.71,22.4 39.12,21.81 39.12,15.08 41.02,13.17 D1.A
SHUTDOWN: length 38.2
  TOP w0.152: v1(66.42,17.11) 66.42,18.63 67.21,19.42 67.21,24.57 66.55,25.24 66.55,29.85 70.48,33.79 70.48,38.06 71.63,39.21 U15.25
  BOTTOM w0.152: v1(66.42,17.11) 61.85,17.11 58.42,13.68 R10.1
N113958: length 13.6
  TOP w0.152: J4.2 87.8,39.97 R4.1 R6.1 R7.1 ; P2.6 v1(93.04,37.6)
  BOTTOM w0.152: v1(93.04,37.6) 90.58,40.06 J4.2
N114102: length 34.9
  TOP w0.152: R7.2 92.57,42.6 v1(92.96,42.6) P2.2 ; U15.39 v1(67.96,35.38)
  BOTTOM w0.152: v1(67.96,35.38) 68.99,36.41 70.23,36.41 71.12,35.52 74.68,35.52 83.82,44.67 89.66,44.67 91.72,42.6 v1(92.96,42.6)
N114106: length 35.3
  TOP w0.152: R6.2 92.17,41.35 v1(92.96,41.35) P2.3 ; v1(68.83,35.4) 68.83,35.74 68.68,35.89 67.75,35.89 67.74,35.88 U15.38
  BOTTOM w0.152: v1(92.96,41.35) 92.34,41.35 89.47,44.23 84.14,44.23 75.11,35.19 70.69,35.19 69.85,36.03 69.47,36.03 v1(68.83,35.4)
N114110: length 35.5
  TOP w0.152: v1(69.72,35.4) 69.72,35.9 69.24,36.38 U15.37 ; R4.2 92.05,40.1 v1(92.96,40.1) P2.4
  BOTTOM w0.152: v1(69.72,35.4) 70.35,34.76 75.57,34.76 84.58,43.78 89.29,43.78 v1(92.96,40.1)
N114114: length 25.9
  TOP w0.152: U15.24 72.13,41.37 v1(72.01,41.49) ; v1(77.47,41.75) 83.57,41.75 86.49,38.82 88.65,38.82 89.19,38.28 R8.1 C3.1 92.52,38.85 P2.5
  BOTTOM w0.152: v1(77.47,41.75) 76.71,40.98 72.52,40.98 v1(72.01,41.49)
N119424: length 2.7
  TOP w0.152: R13.2 92.41,19.78 P4.3
N119428: length 26.3
  TOP w0.152: v1(72.01,24.98) 72.14,25.11 72.14,27.48 72.63,27.98 U15.58 ; v1(90.3,23.08) 90.3,21.84 C4.2 R13.1
  BOTTOM w0.152: v1(72.01,24.98) 72.1,24.89 83.53,24.89 84.96,23.46 89.92,23.46 v1(90.3,23.08)
N316048: length 45.3
  TOP w0.152: v1(92.2,12.66) 92.2,10.63 92.56,10.27 P5.4 ; v1(68.07,27.9) 68.13,27.96 U15.49
  BOTTOM w0.152: v1(92.2,12.66) 92.2,14.19 94.23,16.22 94.23,22.82 93.09,23.97 85.22,23.97 83.82,25.36 72.52,25.36 69.51,28.37 68.54,28.37 v1(68.07,27.9)
N316068: length 45.1
  TOP w0.152: v1(93.22,12.79) 94.53,12.79 P5.2 ; v1(67.95,31.97) 67.86,31.88 U15.46
  BOTTOM w0.152: v1(93.22,12.79) 93.22,14.44 94.62,15.84 94.62,23.08 93.22,24.47 85.47,24.47 84.2,25.74 72.77,25.74 67.95,30.57 v1(67.95,31.97)
N316080: length 36.8
  TOP w0.152: P5.1 v1(94.55,14.63) ; v1(76.07,33.74) 76.21,33.88 U15.7
  BOTTOM w0.152: v1(94.55,14.63) 95.25,15.33 95.25,23.08 92.51,25.82 91.03,25.82 88.27,28.58 88.27,32.35 86.65,33.96 C78.2 77.38,33.74 v1(76.07,33.74)
N316972: length 2.2
  TOP w0.152: D5.K R14.1
N317032: length 9
  TOP w0.152: D6.A 72.14,46.62 72.14,42.89 70.63,41.38 U15.27
N317036: length 2.2
  TOP w0.152: D6.K R15.1
N317096: length 10
  TOP w0.152: U15.26 71.13,41.38 72.47,42.72 72.47,45.85 73.67,47.05 74.48,47.05 D7.A
N317100: length 2.2
  TOP w0.152: D7.K R16.1
N320425: length 33.4
  TOP w0.152: v1(30.48,13.68) 30.06,14.1 R11.2
  BOTTOM w0.152: v1(30.48,13.68) 31.12,13.04 31.12,8.09 32.46,6.74 50.72,6.74 51.56,7.58 D2.K 50.21,10.75 R9.1
N320494: length 1.7
  TOP w0.152: R11.1 R12.2
N320696: length 6.4
  BOTTOM w0.152: D2.A 52.19,13.68 R10.2 53.71,13.63 D4.K 53.72,11.89 C1.2
N321457: length 3
  BOTTOM w0.152: D1.K 43.69,9.87 44.32,10.5 R5.1
N379550: length 3.1
  TOP w0.152: C60.1 68.63,42.94 U15.31
N379578: length 2.2
  TOP w0.152: C61.1 64.92,31.2 65.1,31.38 U15.47
N382210: length 1.6
  TOP w0.152: U1.56 43.58,15.22 C69.2
N382270: length 1.6
  TOP w0.152: C66.1 58.2,17.23 R23.1
N382306: length 5.8
  TOP w0.152: R24.1 R21.2 54.1,18.76 53.18,17.83 U1.3
N382374: length 5.4
  TOP w0.152: U1.2 54.24,17.33 54.34,17.23 R23.2 C68.1
N382386: length 5.6
  TOP w0.152: R22.2 54.36,14.19 53.09,15.46 53.09,16.6 52.85,16.83 U1.1
N382652: length 3.3
  TOP w0.152: U1.52 42.37,18.83 42.25,18.96 41.83,18.96 41.23,18.36 41.1,18.36 C14.2
N382656: length 5.4
  TOP w0.152: 42.6,19.33 42.29,19.65 42.48,19.83 U1.50 ; 42.6,19.33 42.22,19.33 41.06,20.5 40.51,20.5 ; 42.6,19.33 U1.51
N382740: length 2.4
  TOP w0.152: U1.7 v1(52.65,19.83)
  BOTTOM w0.152: R25.2 51.84,19.83 v1(52.65,19.83)
N382848: length 3.5
  TOP w0.152: U1.48 42.43,20.83 42.35,20.92 41.4,20.92 v1(41.27,21.04)
  BOTTOM w0.152: v1(41.27,21.04) 41.27,20.92 41.06,20.7 C15.1
N382956: length 6.8
  TOP w0.152: U1.13 52.31,22.83 v1(52.7,22.44)
  BOTTOM w0.406: v1(52.7,22.44) 52.2,21.93 C38.2 51.69,22.02 C22.2 C21.2
N383040: length 6.5
  TOP w0.152: v1(56.52,23.46) 56.01,22.95 53,22.95 52.62,23.33 U1.14
  BOTTOM w0.152: v1(56.52,23.46) C19.2
N383044: length 3.6
  TOP w0.152: U1.43 42.14,23.33 42.02,23.46 41.03,23.46 40.82,23.24 C20.1
N383064: length 3
  TOP w0.152: v1(53.21,23.46) 52.84,23.83 U1.15
  BOTTOM w0.152: C19.1 v1(53.21,23.46)
N383228: length 3.6
  TOP w0.152: C23.1 40.45,25.84 42.4,25.84 42.41,25.83 U1.38
N383264: length 2.6
  TOP w0.152: R27.2 38.52,34.13 Q1.3
N383316: length 5
  TOP w0.152: U1.23 52.38,27.83 52.45,27.9 v1(53.09,27.9)
  TOP w0.406: v1(53.09,27.9) 53.59,27.9 C24.2
  BOTTOM w0.406: C35.2 v1(53.09,27.9)
N383358: length 8.2
  TOP w0.152: 52.58,29.83 U1.27 ; U1.24 52.25,28.33
  TOP w0.406: C25.2 54.39,32.56 C75.2 53.85,30.7 52.99,29.83 52.58,29.83 52.58,28.66 52.25,28.33
N399081: length 2.4
  TOP w0.152: v1(24.3,48.73) 23.97,49.06 Q5.7
  BOTTOM w0.152: v1(24.3,48.73) R41.2
N399151: length 2.4
  TOP w0.152: v1(24.26,40.86) 23.97,41.15 Q2.7
  BOTTOM w0.152: v1(24.26,40.86) 24.3,40.89 R36.2
N405714: length 2.7
  TOP w0.152: v1(24,22.82) 24,23.45 23.84,23.61 Q4.7
  BOTTOM w0.152: v1(24,22.82) 24,24.18 R35.2
N405958: length 2.3
  TOP w0.152: Q6.7 24.17,31.64 v1(24.17,30.86)
  BOTTOM w0.152: R42.2 v1(24.17,30.86)
N406713: length 2.7
  TOP w0.152: Q3.7 v1(23.84,8.05)
  BOTTOM w0.152: R37.2 24.77,8.05 v1(23.84,8.05)
N406957: length 2
  TOP w0.152: Q7.7 v1(23.84,15.55)
  BOTTOM w0.152: R43.2 24.64,15.55 v1(23.84,15.55)
N413411: length 1.8
  TOP w0.152: C45.1 10.94,38.4 10.34,39 U12.2
N415177: length 1.8
  TOP w0.152: C46.1 10.94,20.96 10.34,21.55 U13.2
N415727: length 1.8
  TOP w0.152: C47.1 11.07,4.7 10.47,5.3 U14.2
N421403: length 2.9
  TOP w0.152: v1(65.28,51.02) 65.69,50.61 P1.1
  BOTTOM w0.152: R1.1 v1(65.28,51.02)
N421435: length 2.8
  TOP w0.152: v1(66.93,51.02) 66.93,49.18 P1.2
  BOTTOM w0.152: R2.1 v1(66.93,51.02)
N421455: length 20.3
  TOP w0.152: U15.44 64.63,32.88 64.6,32.86 64.18,32.86 63.25,33.79 63.25,39.21 63.83,39.79 63.83,46.52 v1(64.26,46.95)
  BOTTOM w0.152: R2.2 65.95,47.41 64.72,47.41 v1(64.26,46.95)
N421467: length 2.9
  TOP w0.152: v1(68.58,51.02) 68.19,50.62 P1.3
  BOTTOM w0.152: R3.1 v1(68.58,51.02)
N421471: length 24.2
  TOP w0.152: U15.45 64.04,32.38 62.74,33.68 62.74,39.59 63.37,40.22 63.37,46.7 v1(63.25,46.83)
  BOTTOM w0.152: R3.2 68.58,47.71 67.95,47.08 65.15,47.08 64.52,46.44 63.63,46.44 v1(63.25,46.83)
N440238: length 4.8
  TOP w0.152: U15.5 79.2,32.88 Y1.1 80.17,30.19 C79.2
N440256: length 9
  TOP w0.152: C51.2 86.07,34.31 Y1.3 84.11,34.25 82.93,34.25 82.06,33.38 U15.6
N453854: length 1.8
  TOP w0.152: C27.2 46.79,34.14 U6.1
N453874: length 1.8
  TOP w0.152: C28.2 46.79,37.44 U7.1
N453894: length 1.8
  TOP w0.152: C29.2 46.79,40.74 U8.1
N475951: length 3.8
  TOP w0.152: U15.60 73.63,26.91 TP2.1 R49.2
N476249: length 5.1
  TOP w0.152: U15.28 70.13,41.39 71.12,42.38 TP1.1 R50.2
N483635: length 35.1
  TOP w0.152: v1(30.73,22.44) 30.99,22.19 37.97,22.19 38.61,21.55 41.49,21.55 41.71,21.33 42.15,21.33 42.16,21.33 U1.47
  BOTTOM w0.152: v1(30.73,22.44) 31.12,22.82 31.12,25.11 27.46,28.77 27.46,35.75 26,37.21 R36.1
N483651: length 41.4
  TOP w0.152: U1.45 42.16,22.33 42.15,22.34 39.29,22.34 38.18,23.46 v1(31.62,23.46)
  BOTTOM w0.152: v1(31.62,23.46) 31.62,27.14 29.97,28.79 29.97,46.57 27,49.54 R41.1
N483659: length 24.6
  TOP w0.152: 28.36,10.5 28.36,10.4 ; U1.39 v1(42.19,25.33) ; v1(41.66,22.95) 41.77,22.83 U1.44 ; U1.34 42.13,27.83 v1(41.88,28.09)
  TOP w0.406: C46.2 v1(11.05,23.46) ; U10.3 v1(8.18,27.2) ; U12.3 8.7,39.65 v1(8.64,39.71) ; R48.1 28.96,29.05 v1(28.7,29.3) ; C48.2 29.21,27.9 v1(28.7,28.41) ; U11.3 8.31,9.67 v1(8,9.36) ; v1(8.13,28.03) 8.31,27.85 U10.2 ; U13.3 v1(9.48,22.9) ; C43.2 v1(12.7,23.46) ; U11.2 v1(7.95,10.32) ; U9.3 8.61,44.77 v1(8.51,44.67) ; C47.2 v1(11.18,7.2) ; C45.2 v1(11.05,40.86) ; U14.3 v1(9.61,6.52) ; C44.2 v1(12.83,7.2) ; C42.2 v1(12.7,40.86) ; U9.2 v1(8.51,45.42)
  BOTTOM w0.406: v1(8.64,19.9) 8.72,19.99 C53.1 ; v1(8.64,39.71) 8.98,39.37 C54.1 ; C55.1 v1(9.49,3.94)
  vias: v1(0.89,20.66) v1(0.89,5.17) v1(1.27,41.36) v1(1.27,37.81) v1(3.56,24.09) v1(4.06,41.49) v1(4.19,37.68) v1(4.7,20.92) v1(5.59,7.07) v1(5.97,41.49) v1(7.49,0.85) v1(8.64,41.49) v1(9.14,7.07) v1(10.03,2.5) v1(11.43,0.98) v1(11.56,18) v1(11.68,54.06) v1(11.68,52.29) v1(12.19,35.52) v1(12.83,42) v1(16,20.66) v1(16.51,0.85) v1(20.57,34.55) v1(20.57,33.92) v1(20.57,33.28) v1(20.57,32.65) v1(20.57,32.01) v1(20.57,31.38) v1(20.57,30.74) v1(20.57,30.11) v1(20.57,16.9) v1(20.57,16.26) v1(20.57,15.63) v1(20.57,14.99) v1(20.57,14.36) v1(20.57,13.72) v1(20.57,13.09) v1(20.57,12.45) v1(20.7,51.95) v1(20.7,51.32) v1(20.7,50.68) v1(20.7,50.05) v1(20.7,49.41) v1(20.7,48.78) v1(20.7,48.14) v1(21.34,34.55) v1(21.34,33.92) v1(21.34,33.28) v1(21.34,32.65) v1(21.34,32.01) v1(21.34,31.38) v1(21.34,30.74) v1(21.34,30.11) v1(21.34,16.9) v1(21.34,16.26) v1(21.34,15.63) v1(21.34,14.99) v1(21.34,14.36) v1(21.34,13.72) v1(21.34,13.09) v1(21.34,12.45) v1(21.46,51.95) v1(21.46,51.32) v1(21.46,50.68) v1(21.46,50.05) v1(21.46,49.41) v1(21.46,48.78) v1(21.46,48.14) v1(21.84,0.85) v1(26.42,0.85) v1(28.7,36.41) v1(28.83,32.6) v1(28.96,0.85) v1(29.08,20.28) v1(29.21,8.22) v1(29.21,3.52) v1(29.34,12.92) v1(30.35,50.64) v1(30.48,53.81) v1(30.86,37.3) v1(33.78,27.65) v1(36.7,53.94) v1(37.34,25.62) v1(41.4,51.02) v1(42.29,53.81) v1(46.99,53.81) v1(51.69,50.89) v1(53.59,53.68)
N488558: length 7.7
  TOP w0.152: v1(92.84,30.57) 92.16,30.57 R19.2 91.97,30.66 91.44,30.13 U3.7 ; P6.3 v1(95.87,29.31)
  BOTTOM w0.152: v1(92.84,30.57) 94.1,29.31 v1(95.87,29.31)
N488562: length 5.6
  TOP w0.152: P6.2 93.72,30.56 93.09,29.93 93.09,29.3 92.75,28.96 R19.1 91.97,28.96 91.44,29.48 U3.6
N488738: length 12.5
  TOP w0.152: v1(68.71,27.52) 68.71,28.21 68.63,28.28 U15.50 ; v1(64.01,24.98) 64.01,23.71 63.67,23.37 R18.1 61.72,22.61 U2.13
  BOTTOM w0.152: v1(68.71,27.52) 68.2,27.01 67.82,27.01 65.79,24.98 v1(64.01,24.98)
N488742: length 36.8
  TOP w0.152: U2.14 61.22,22.98 R17.1 60.16,23.37 59.92,23.61 59.92,32.58 61.21,33.87 61.21,40.6 62.74,42.13 v1(62.74,45.94) ; v1(71.12,47.59) R50.1
  BOTTOM w0.152: v1(71.12,47.59) 70.23,46.7 66.93,46.7 65.91,45.68 62.99,45.68 v1(62.74,45.94)
N490262: length 14.4
  TOP w0.152: v1(74.8,30.32) 74.63,30.14 U15.62 ; U3.1 86.53,30.78 v1(86.36,30.95)
  BOTTOM w0.152: v1(74.8,30.32) 82.17,30.32 82.55,30.7 83.01,30.7 83.24,30.47 85.88,30.47 v1(86.36,30.95)
N490274: length 15.9
  TOP w0.152: v1(73.91,30.32) 74.13,30.1 U15.61 ; v1(84.07,28.28) 86.36,28.28 86.91,28.83 U3.4
  BOTTOM w0.152: v1(84.07,28.28) 82.8,28.28 81.28,29.81 74.42,29.81 v1(73.91,30.32)
N490496: length 53.1
  TOP w0.152: v1(74.17,39.08) 74.13,39.11 U15.20 ; v1(62.1,40.73) 62.1,39.21 61.59,38.69 61.59,33.78 60.25,32.44 60.25,26.51 61.01,25.76 63.95,25.76 66.55,23.16 66.55,19.69 65.58,18.73 65.58,16.25 66.62,15.21 66.62,11.57 68.09,10.1 U4.32
  BOTTOM w0.152: v1(74.17,39.08) 74.04,39.08 73.28,39.84 68.2,39.84 67.31,40.73 v1(62.1,40.73)
N490506: length 39.7
  TOP w0.152: v1(62.1,38.19) 61.98,38.06 61.98,33.7 60.58,32.3 60.58,26.65 60.98,26.25 63.92,26.25 66.88,23.3 66.88,19.55 65.91,18.59 65.91,16.39 66.95,15.35 66.95,11.96 67.71,11.2 U4.31 ; U15.33 64.83,38.38 v1(64.77,38.44)
  BOTTOM w0.152: v1(62.1,38.19) 62.99,38.19 63.25,38.44 v1(64.77,38.44)
N490510: length 20
  TOP w0.152: v1(68.96,26.38) 69.34,26.76 69.34,26.84 69.63,27.13 U15.52 ; v1(82.17,22.7) 82.21,22.65 U4.15
  BOTTOM w0.152: v1(68.96,26.38) 73.15,22.19 81.66,22.19 v1(82.17,22.7)
N490514: length 17.7
  TOP w0.152: v1(69.85,26.63) 70.13,26.91 U15.53 ; U4.16 81.11,22.65 v1(81.15,22.7)
  BOTTOM w0.152: v1(81.15,22.7) 73.32,22.7 69.85,26.17 v1(69.85,26.63)
N490522: length 3.7
  TOP w0.152: U4.17 80.01,24.38 R20.2
N492162: length 23
  TOP w0.152: P3.7 88.72,47.92 87,46.19 74.04,46.19 73.13,45.28 U15.22
N492166: length 27.7
  TOP w0.152: P3.6 87.47,47.56 86.64,46.72 74.07,46.72 72.8,45.46 72.8,42.16 72.63,41.99 U15.23 v1(72.63,39.08) ; U15.29 v1(69.63,39.21)
  BOTTOM w0.152: v1(72.63,39.08) 72.5,39.21 v1(69.63,39.21)
N492170: length 26
  TOP w0.152: U15.30 69.13,41.53 69.98,42.38 69.98,47.71 70.74,48.48 v1(72.01,48.48) ; P3.5 v1(86.22,47.84)
  BOTTOM w0.152: v1(86.22,47.84) 85.55,48.51 78.24,48.51 78.2,48.48 v1(72.01,48.48)
N492258: length 20.4
  TOP w0.152: P3.4 v1(84.97,47.84) ; v1(84.84,45.3) 84.45,45.68 74.17,45.68 73.63,45.15 U15.21
  BOTTOM w0.152: v1(84.97,47.84) 84.97,45.95 84.84,45.81 v1(84.84,45.3)
N494356: length 23.7
  TOP w0.152: U1.17 52.86,24.83 53,24.98 57.15,24.98 59.11,26.94 59.11,33.2 59.89,33.99 v1(59.89,34.89) ; v1(65.02,34.38) U15.41
  BOTTOM w0.152: v1(59.89,34.89) 60.02,34.76 64.65,34.76 v1(65.02,34.38)
N494360: length 23.6
  TOP w0.152: v1(58.67,34.89) 58.67,33.7 58.45,33.47 58.45,27.29 56.99,25.83 U1.19 ; U15.42 65.52,33.88 65.52,33.88 64.81,33.88 64.69,34 v1(64.01,34)
  BOTTOM w0.152: v1(64.01,34) 59.56,34 v1(58.67,34.89)
N494364: length 22.1
  TOP w0.152: v1(64.39,33.36) 66.24,33.36 U15.43 ; v1(57.78,34) 57.78,27.65 56.97,26.83 U1.21
  BOTTOM w0.152: v1(57.78,34) 58.42,33.36 v1(64.39,33.36)
N494368: length 26
  TOP w0.152: U15.34 64.21,37.88 v1(64.01,37.68) ; v1(59.56,35.52) 59.27,35.23 59.27,33.83 58.78,33.34 58.78,27.11 57,25.33 U1.18
  BOTTOM w0.152: v1(59.56,35.52) 59.05,36.03 59.05,36.49 59.56,37 61.93,37 62.61,37.68 v1(64.01,37.68)
N494372: length 24.4
  TOP w0.152: U15.35 64.85,37.38 v1(64.77,37.3) ; U1.20 56.98,26.33 58.12,27.47 58.12,33.61 58.29,33.79 58.29,34.21 58.17,34.34 58.17,35.42 59.03,36.28 v1(59.56,36.28)
  BOTTOM w0.152: v1(64.77,37.3) 64.64,37.17 62.61,37.17 62.1,36.67 59.94,36.67 v1(59.56,36.28)
N494376: length 23.9
  TOP w0.152: U1.22 56.84,27.33 57.4,27.9 57.4,33.66 57.28,33.79 57.28,35 59.07,36.79 59.94,36.79 v1(60.58,36.16) ; v1(64.14,36.41) 64.26,36.54 64.85,36.54 65.2,36.88 U15.36
  BOTTOM w0.152: v1(64.14,36.41) 63.88,36.16 v1(60.58,36.16)
N494756: length 28.7
  TOP w0.152: v1(59.12,22) 58.27,21.15 54.68,21.15 52.87,19.33 52.43,19.33 52.43,19.33 U1.6 ; U15.59 73.13,28.01 72.64,27.52 72.64,24.73 72.26,24.35 71.37,24.35 v1(70.48,23.46)
  BOTTOM w0.152: v1(70.48,23.46) 68.45,21.43 62.27,21.43 61.7,22 v1(59.12,22)
N494760: length 28.6
  TOP w0.152: v1(69.72,23.46) 69.72,23.71 71.62,25.61 71.62,27.43 72.13,27.94 U15.57 ; U1.16 v1(53.07,24.33)
  BOTTOM w0.152: v1(69.72,23.46) 68.83,22.57 53.38,22.57 52.7,23.25 52.7,23.97 v1(53.07,24.33) 53.37,24.33 R26.2
N495156: length 24.7
  TOP w0.152: U1.10 52.91,21.33 53.76,22.19 56.9,22.19 v1(58.55,23.84) ; v1(68.83,24.47) 69.3,24.47 70.96,26.13 70.96,27.71 71.13,27.88 U15.55
  BOTTOM w0.152: v1(58.55,23.84) 67.95,23.84 68.58,24.47 v1(68.83,24.47)
N495160: length 25.4
  TOP w0.152: v1(68.96,23.71) 69.01,23.71 71.29,26 71.29,27.57 71.63,27.91 U15.56 ; v1(58.93,23.08) 57.66,21.81 53.85,21.81 52.88,20.83 U1.9
  BOTTOM w0.152: v1(68.96,23.71) 68.33,23.08 v1(58.93,23.08)
N495164: length 22.1
  TOP w0.152: v1(57.66,23.71) 56.52,22.57 53.68,22.57 52.94,21.83 U1.11 ; v1(68.2,26.51) 68.58,26.89 68.79,26.89 69.22,27.31 69.22,27.73 69.13,27.82 U15.51
  BOTTOM w0.152: v1(57.66,23.71) 58.42,24.47 66.17,24.47 v1(68.2,26.51)
N495168: length 28.2
  TOP w0.152: v1(60.71,35.4) 60.71,34.33 59.49,33.11 59.49,22.92 59.14,22.57 58.89,22.57 57.79,21.48 53.98,21.48 53.01,20.5 52.29,20.5 52.12,20.33 U1.8 ; U15.40 65.24,34.88 64.6,35.52 v1(64.14,35.52)
  BOTTOM w0.152: v1(60.71,35.4) 64.01,35.4 v1(64.14,35.52)
N495709: length 39
  TOP w0.152: v1(73.28,36.28) 74.38,37.38 U15.14 ; v1(49.78,31.84) 47.92,31.84 47.38,32.39 C27.1 R32.1 R29.2
  BOTTOM w0.152: v1(73.28,36.28) 73.03,36.03 71.63,36.03 70.87,36.79 68.71,36.79 66.55,38.95 58.93,38.95 51.82,31.84 v1(49.78,31.84)
N495713: length 37.1
  TOP w0.152: v1(50.55,35.13) 47.94,35.13 47.38,35.69 C28.1 R33.1 R30.2 ; v1(71.12,37.3) 72.9,37.3 73.48,37.88 U15.15
  BOTTOM w0.152: v1(71.12,37.3) 68.83,37.3 66.85,39.28 58.62,39.28 54.47,35.13 v1(50.55,35.13)
N495717: length 35.7
  TOP w0.152: R31.2 R34.1 C29.1 47.25,38.99 47.8,38.44 v1(50.8,38.44) ; v1(72.14,37.94) 72.77,37.94 73.22,38.38 U15.16
  BOTTOM w0.152: v1(50.8,38.44) 56.9,38.44 58.06,39.61 67.03,39.61 68.71,37.94 v1(72.14,37.94)
N495721: length 55.2
  TOP w0.152: v1(31.53,33.4) R28.1 33.9,33.4 Q1.2 ; U15.11 74.95,35.88 v1(74.42,36.41)
  BOTTOM w0.152: v1(31.53,33.4) 31.53,36.32 34.92,39.71 45.97,39.71 46.98,40.72 51.45,40.72 52.21,39.95 67.45,39.95 68.96,38.44 72.39,38.44 v1(74.42,36.41)
N495725: length 41.6
  TOP w0.152: v1(75.82,31.33) 77.46,31.33 U15.2 ; v1(49.8,32.87) 50.73,32.87 U6.4 ; U7.4 v1(49.8,36.14) ; U8.4 v1(49.8,39.45)
  BOTTOM w0.152: v1(49.8,39.45) v1(49.8,36.14) v1(49.8,32.87) 49.28,32.35 49.28,31.63 49.57,31.33 53.85,31.33 55.37,32.86 65.41,32.86 66.29,33.74 73.87,33.74 75.82,31.8 v1(75.82,31.33)
